# Altium PCB ESD_Mainboard_PCB.PcbDoc
Units mil, origin at the board's own origin, x right, y up, seen from the top; angles counter-clockwise.
Board outline 6000 x 4000 mil, 2 copper layers (Top Layer, Bottom Layer), stack 61.811 mil thick; 10 components, 0 nets, 0 pads, 0 vias.
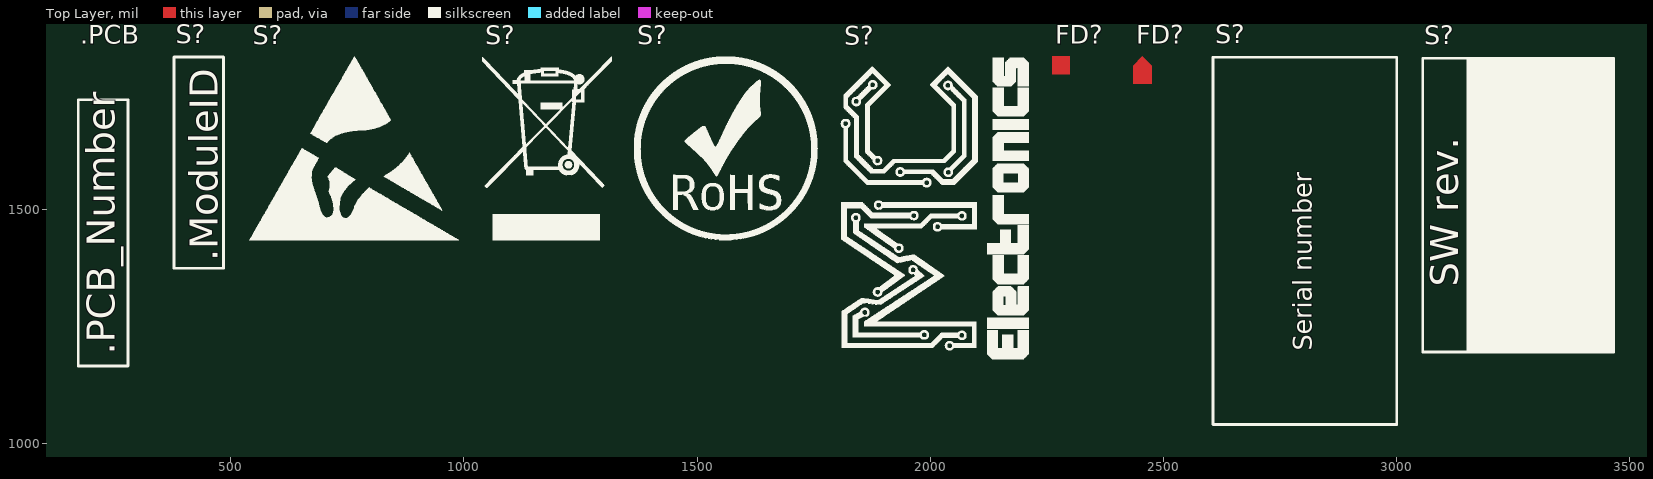
[diagram p0: Top Layer view]
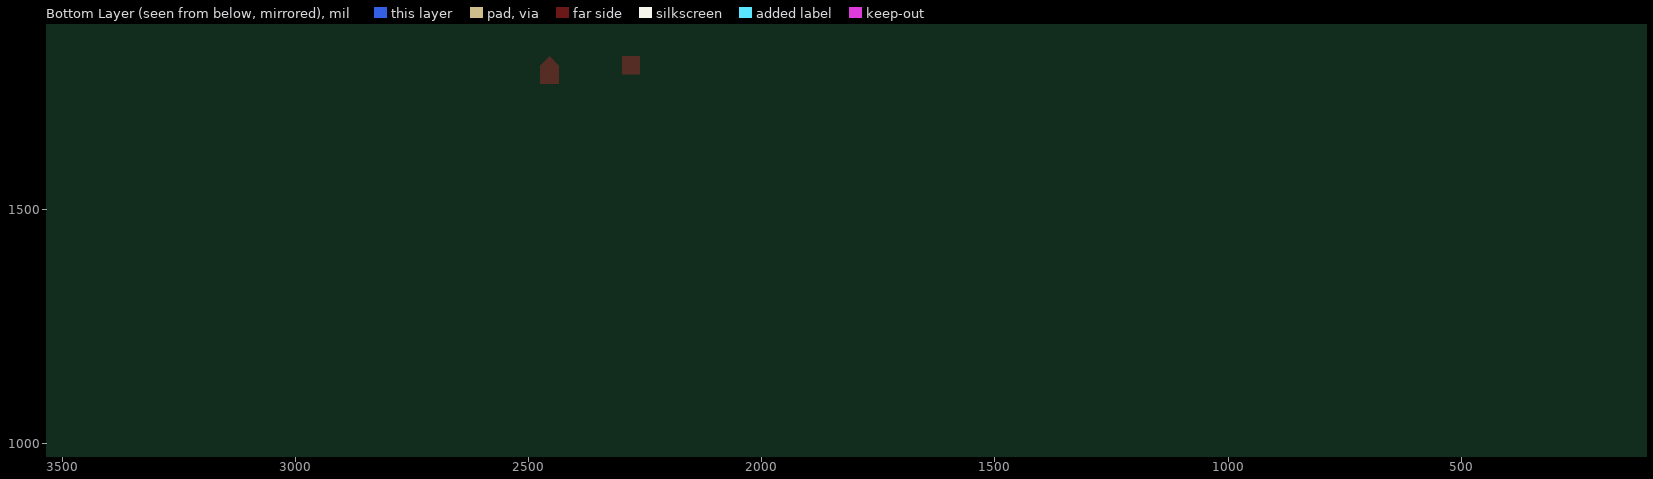
[diagram p1: Bottom Layer view, seen from below]

## Layer stack, top to bottom
Top Solder: solder mask 0.3937, Solder Resist, Dk 3.5
Top Layer: signal copper 1.378
Dielectric 1: dielectric 59.0551, FR-4, Dk 4.4
Bottom Layer: signal copper 1.378
Bottom Solder: solder mask 0.3937, Solder Resist, Dk 3.5

## Board outline
-250,-240 5750,-240 5750,3760 -250,3760

## Design rules (kind name [scope] priority, off if disabled: settings)
BoardOutlineClearance [All] p1: gap=11.81 ignorepadtopadclearanceinfootprint=FALSE
Clearance Clearance_1 [All] p1: gap=7.87 ignorepadtopadclearanceinfootprint=FALSE
HoleSize [All] p1: absolutevalues=TRUE maxlimit=100 minlimit=11.81 maxpercent=80.000 minpercent=20.000
HoleToHoleClearance [All] p1: gap=5 allowstackedmicrovias=TRUE
MinimumSolderMaskSliver [All] p1: minsoldermaskwidth=3.94
PolygonConnect [All] p1: connectstyle=Relief reliefconductorwidth=10 reliefentries=4 polygonreliefangle="90 Angle" airgapwidth=10
RoutingCorners [All] p1: cornerstyle=45-Degree minsetback=50 maxsetback=100
RoutingVias [All] p1: holewidth=19.68 width=39.37 viastyle="Through Hole" minholewidth=11.81 minwidth=19.68 maxholewidth=39.37 maxwidth=78.74
SilkToSilkClearance [All] p1: silktosilkclearance=6
SilkToSolderMaskClearance [IsPad] p1: minsilkscreentomaskgap=5.91 clearancetoexposedcopper=TRUE
SolderMaskExpansion [All] p1: expansion=4 istentingtop=FALSE
UnRoutedNet [All] p1: checkbadconnections=TRUE
Width [All] p1: maxlimit=78.74 minlimit=5 preferedwidth=10
23 further rules are at their usual default settings.

## Classes and differential pairs
component class Main: .PCB FD? S?

## Components (designator, comment, footprint, x,y, rotation, side; value= is the part's Value field where it differs from the comment)
.PCB "PCB Number" "PCB number 60mils" 280,1165 r90 top
FD? "Fiducial_house" Fiducial_house_1mm 2435,1770 r0 top
FD? "Fiducial_square" Fiducial_square_1mm 2300,1790 r90 top
S? "RoHS 10mm" "RoHS 10mm" 1365,1435 r0 top
S? "SW rev. 8x16mm" "SW rev. 8x16mm" 3465,1195 r90 top
S? "ESD 10mm" "ESD 10mm" 540,1435 r0 top
S? "MC Logo 10mm" "MC Logo 10mm" 2230,1155 r90 top
S? "Module ID 60mils" "Module ID 60mils" 485,1375 r90 top
S? "Serial number place" "Serial number place 10x20mm" 3000,1040 r90 top
S? "WEEE 10mm" "WEEE 10mm" 1040,1435 r0 top

## Footprints (in the part's own frame and the unit in brackets; to place one, negate y for a bottom-side part, rotate by r counter-clockwise, add the part's x,y. Pads: shape width x height; smd on the part's side, far side on the other; paste and mask are expansions set on the pad)
"ESD 10mm" [mil]
  silkscreen extent 0,0 450,394
Fiducial_house_1mm [mil] "1mm house-shape fiducial"
  Top Layer region: 0,0 0,39.37 19.68,59.06 39.37,39.37 39.37,39.37 39.37,0
Fiducial_square_1mm [mil]
  Top Layer region: 0,0 39.37,0 39.37,39.37 0,39.37
"MC Logo 10mm" [mil]
  silkscreen extent 25,19 671,422
"Module ID 60mils" [mil]
  silkscreen extent 0,0 453,106
"PCB number 60mils" [mil]
  silkscreen extent 0,0 571,106
"RoHS 10mm" [mil]
  silkscreen extent 0,0 393,394
"Serial number place 10x20mm" [mil]
  silkscreen extent 0,0 787,394
"SW rev. 8x16mm" [mil]
  silkscreen extent 0,0 630,409
"WEEE 10mm" [mil]
  silkscreen extent 0,0 277,393

## Part data
.PCB: library part MC-CMP-012-00021-4, Generic=No, Mount type=SMT, PCB_Number==PCB_Number
FD?: library part MC-CMP-016-00003-6, "1mm house-shape fiducial", Generic=Yes, MC_ID=xx, Mount type=SMT
FD?: library part MC-CMP-016-00002-5, "1mm square fiducial", Generic=Yes, MC_ID=xx, Mount type=SMT
S?: library part MC-CMP-012-00017-7, "RoHS sign 10mm", Generic=No, MC_ID=-, Mount type=SMT
S?: library part MC-CMP-012-00014-5, "SW rev. place 8x16mm", Generic=No, MC_ID=-, Mount type=SMT
S?: library part MC-CMP-012-00005-6, "ESD symbol 10mm", Generic=No, MC_ID=-, Mount type=SMT
S?: library part MC-CMP-012-00001-7, Generic=No, MC_ID=-, Mount type=SMT
S?: library part MC-CMP-012-00015-4, "Module ID 60mils text height", Generic=No, MC_ID=-, Mount type=SMT
S?: library part MC-CMP-012-00013-3, "10x20mm place for SN stick", Generic=No, MC_ID=-, Mount type=SMT
S?: library part MC-CMP-012-00009-5, "WEEE bin symbol 10mm", Generic=No, MC_ID=-, Mount type=SMT

## Nets (pads, with @x,y where several pads share a name; then routed paths per layer and width w, separated by ;. In a path a pad name is that pad's centre, name@x,y a point inside that pad or via, vN(x,y) a via of type N, cw(c..) or ccw(c..) an arc to the next point about the centre after c; other vN are vias at no path point)

## Text inside footprints (layer, text, board x,y; h text height)
S?: Top Overlay "SW rev." at 3132.17,1334.92 h60 r90
S?: Top Overlay "Serial number" at 2817.51,1197.43 h40 r90